# Altium PCB Test.PcbDoc
Units mil, origin at the board's own origin, x right, y up, seen from the top; angles counter-clockwise.
Board outline 1102.36 x 3937.01 mil, 2 copper layers (Top Layer, Bottom Layer); 29 components, 0 nets, 130 pads, 0 vias.
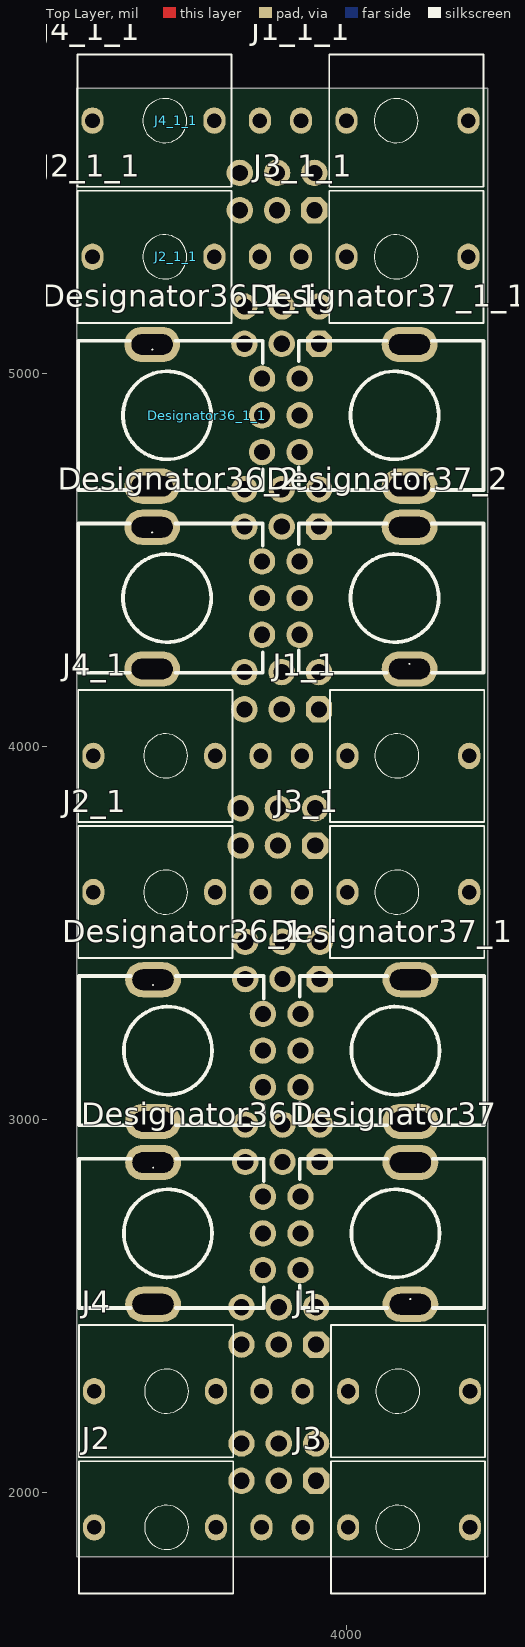
[diagram p0: Top Layer view]
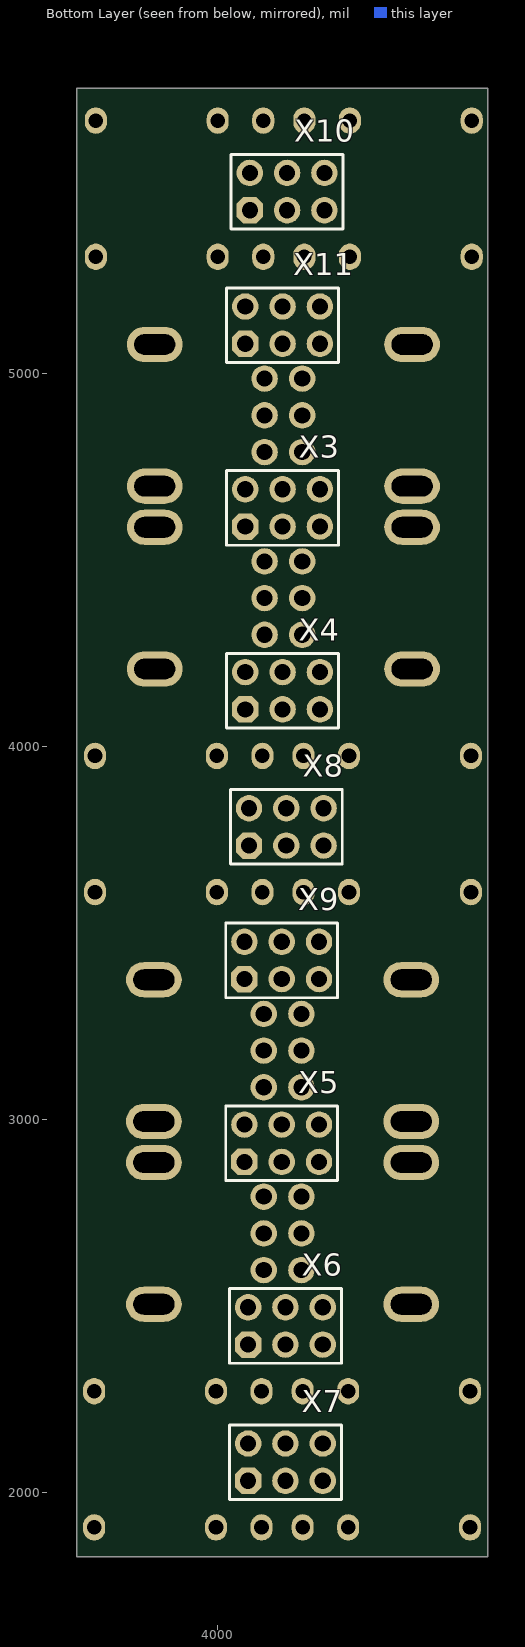
[diagram p1: Bottom Layer view, seen from below]

## Layer stack, top to bottom
Top Solder: solder mask 0.4, Solder Resist, Dk 3.5
Top Layer: signal copper 1.4
Dielectric 1: dielectric 12.6, FR-4, Dk 4.8
Bottom Layer: signal copper 1.4
Bottom Solder: solder mask 0.4, Solder Resist, Dk 3.5

## Board outline
3275,1827.99 3275,5765 4377.36,5765 4377.36,1827.99

## Design rules (kind name [scope] priority, off if disabled: settings)
Clearance [All] p1: gap=10 ignorepadtopadclearanceinfootprint=FALSE
PolygonConnect [All] p1: connectstyle=Relief reliefconductorwidth=10 reliefentries=4 polygonreliefangle="90 Angle" airgapwidth=10
RoutingVias [All] p1: holewidth=28 width=50 viastyle="Through Hole" minholewidth=28 minwidth=50 maxholewidth=28 maxwidth=50
SolderMaskExpansion [All] p1: expansion=4 istentingtop=FALSE
Width [All] p1: maxlimit=10 minlimit=10 preferedwidth=10
30 further rules are at their usual default settings.

## Components (designator, comment, footprint, x,y, rotation, side; value= is the part's Value field where it differs from the comment)
Designator36 "Comment" POT 3550,2695 r90 top
Designator36_1 "Comment" POT 3550,3185 r90 top
Designator36_1_1 "Comment" POT 3547.76,4888.27 r90 top
Designator36_2 "Comment" POT 3547.76,4398.27 r90 top
Designator37 "Comment" POT 4100,2695 r270 top
Designator37_1 "Comment" POT 4100,3185 r270 top
Designator37_1_1 "Comment" POT 4097.76,4888.27 r270 top
Designator37_2 "Comment" POT 4097.76,4398.27 r270 top
J1 "PWM_OUT" THONKICONN 3881.3,2271.89 r270 top
J1_1 "PWM_OUT" THONKICONN 3879.06,3975.16 r270 top (schematic designator J1)
J1_1_1 "PWM_OUT" THONKICONN 3876.81,5678.43 r270 top (schematic designator J1)
J2 "TRI_OUT" THONKICONN 3771.06,1906.73 r90 top
J2_1 "TRI_OUT" THONKICONN 3768.82,3610 r90 top (schematic designator J2)
J2_1_1 "TRI_OUT" THONKICONN 3766.57,5313.27 r90 top (schematic designator J2)
J3 "SAW_OUT" THONKICONN 3881.3,1906.73 r270 top
J3_1 "SAW_OUT" THONKICONN 3879.06,3610 r270 top (schematic designator J3)
J3_1_1 "SAW_OUT" THONKICONN 3876.81,5313.27 r270 top (schematic designator J3)
J4 "PULSE_OUT" THONKICONN 3771.06,2271.89 r90 top
J4_1 "PULSE_OUT" THONKICONN 3768.82,3975.16 r90 top (schematic designator J4)
J4_1_1 "PULSE_OUT" THONKICONN 3766.57,5678.43 r90 top (schematic designator J4)
X3 "Connector, 6pin, 2.54mm, 500VAC, 3A" "CON: PBD-6" 3825,4640 r180 bottom
X4 "Connector, 6pin, 2.54mm, 500VAC, 3A" "CON: PBD-6" 3825,4150 r180 bottom (schematic designator X3)
X5 "Connector, 6pin, 2.54mm, 500VAC, 3A" "CON: PBD-6" 3827.24,2936.73 r180 bottom (schematic designator X3)
X6 "Connector, 6pin, 2.54mm, 500VAC, 3A" "CON: PBD-6" 3817.24,2446.73 r180 bottom (schematic designator X3)
X7 "Connector, 6pin, 2.54mm, 500VAC, 3A" "CON: PBD-6" 3817.24,2081.57 r180 bottom (schematic designator X3)
X8 "Connector, 6pin, 2.54mm, 500VAC, 3A" "CON: PBD-6" 3815,3784.84 r180 bottom (schematic designator X3)
X9 "Connector, 6pin, 2.54mm, 500VAC, 3A" "CON: PBD-6" 3827.24,3426.73 r180 bottom (schematic designator X3)
X10 "Connector, 6pin, 2.54mm, 500VAC, 3A" "CON: PBD-6" 3812.76,5488.11 r180 bottom (schematic designator X3)
X11 "Connector, 6pin, 2.54mm, 500VAC, 3A" "CON: PBD-6" 3825,5130 r180 bottom (schematic designator X3)

## Footprints (in the part's own frame and the unit in brackets; to place one, negate y for a bottom-side part, rotate by r counter-clockwise, add the part's x,y. Pads: shape width x height; smd on the part's side, far side on the other; paste and mask are expansions set on the pad)
"CON: PBD-6" [mm] "PBD-6"
  oct 1.8x1.8 hole 1.1: 1(-2.54,-1.27)
  round 1.8 hole 1.1: 2(-2.54,1.27) 3(0,-1.27) 4(0,1.27) 5(2.54,-1.27) 6(2.54,1.27)
  silkscreen extent -3.81,-2.54 3.81,2.54, body extent -3.81,-2.54 3.81,2.54, height 8.5
POT [mm]
  round 1.8 hole 1.1: 1(-2.5,-5.704) 2(0,-5.704) 3(2.5,-5.704)
  oval 2.4x3.8 hole 1.4 slot 2.8 at 90 deg: MT1(-4.826,1.778) MT1(4.826,1.778)
  silkscreen extent -5.08,-5.76 5.08,6.81, body extent -5.64,-5.73 5.64,6.92, height 21.1
THONKICONN [mm]
  oval 1.8x1.5 hole 1: 1(0,0) 2(0,3.1) 3(0,11.4)
  silkscreen extent -4.5,1.92 4.5,12.42, body extent -4.47,-0.18 4.53,12.45, height 14.5

## Part data
J1 J1_1 J1_1_1 J2 J2_1 J2_1_1 J3 J3_1 J3_1_1 J4 J4_1 J4_1_1: library part PJ-301M-3P, "THONKICONN metal"
X3 X4 X5 X6 X7 X8 X9 X10 X11: library part PBD-6, CurrentMax=3A, Manufacturer=Connfly, VoltageMax=500VAC, CommentText="\"Разъем\"", helpurl=https://www.chipdip.ru/product/pbd-6, Multichannel=6pin, PartNumber=PBD-6, Pitch=2.54mm, TypeConnector=Connector, ValueManufacturerPartNumber="Connector, 6pin, 2.54mm, 500VAC, 3A"

## Nets (pads, with @x,y where several pads share a name; then routed paths per layer and width w, separated by ;. In a path a pad name is that pad's centre, name@x,y a point inside that pad or via, vN(x,y) a via of type N, cw(c..) or ccw(c..) an arc to the next point about the centre after c; other vN are vias at no path point)
pads on no net: Designator36.1 Designator36.2 Designator36.3 Designator36.MT1 Designator36_1.1 Designator36_1.2 Designator36_1.3 Designator36_1.MT1 Designator36_1_1.1 Designator36_1_1.2 Designator36_1_1.3 Designator36_1_1.MT1 Designator36_2.1 Designator36_2.2 Designator36_2.3 Designator36_2.MT1 Designator37.1 Designator37.2 Designator37.3 Designator37.MT1 Designator37_1.1 Designator37_1.2 Designator37_1.3 Designator37_1.MT1 Designator37_1_1.1 Designator37_1_1.2 Designator37_1_1.3 Designator37_1_1.MT1 Designator37_2.1 Designator37_2.2 Designator37_2.3 Designator37_2.MT1 J1.1 J1.2 J1.3 J1_1.1 J1_1.2 J1_1.3 J1_1_1.1 J1_1_1.2 J1_1_1.3 J2.1 J2.2 J2.3 J2_1.1 J2_1.2 J2_1.3 J2_1_1.1 J2_1_1.2 J2_1_1.3 J3.1 J3.2 J3.3 J3_1.1 J3_1.2 J3_1.3 J3_1_1.1 J3_1_1.2 J3_1_1.3 J4.1 J4.2 J4.3 J4_1.1 J4_1.2 J4_1.3 J4_1_1.1 J4_1_1.2 J4_1_1.3 X3.1 X3.2 X3.3 X3.4 X3.5 X3.6 X4.1 X4.2 X4.3 X4.4 X4.5 X4.6 X5.1 X5.2 X5.3 X5.4 X5.5 X5.6 X6.1 X6.2 X6.3 X6.4 X6.5 X6.6 X7.1 X7.2 X7.3 X7.4 X7.5 X7.6 X8.1 X8.2 X8.3 X8.4 X8.5 X8.6 X9.1 X9.2 X9.3 X9.4 X9.5 X9.6 X10.1 X10.2 X10.3 X10.4 X10.5 X10.6 X11.1 X11.2 X11.3 X11.4 X11.5 X11.6

## Silkscreen, mask and mechanical layers (free items; w line width, h text height)
Board Shape:
  the board outline again, w1